# Altium PCB Main.PcbDoc
Units mm, origin at the board's own origin, x right, y up, seen from the top; angles counter-clockwise.
Board outline 72.5 x 55.5 mm, 4 copper layers (Top Layer, Ground Layer, Power Layer, Bottom Layer), stack 1.591 mm thick; 80 components, 69 nets, 301 pads, 91 vias.
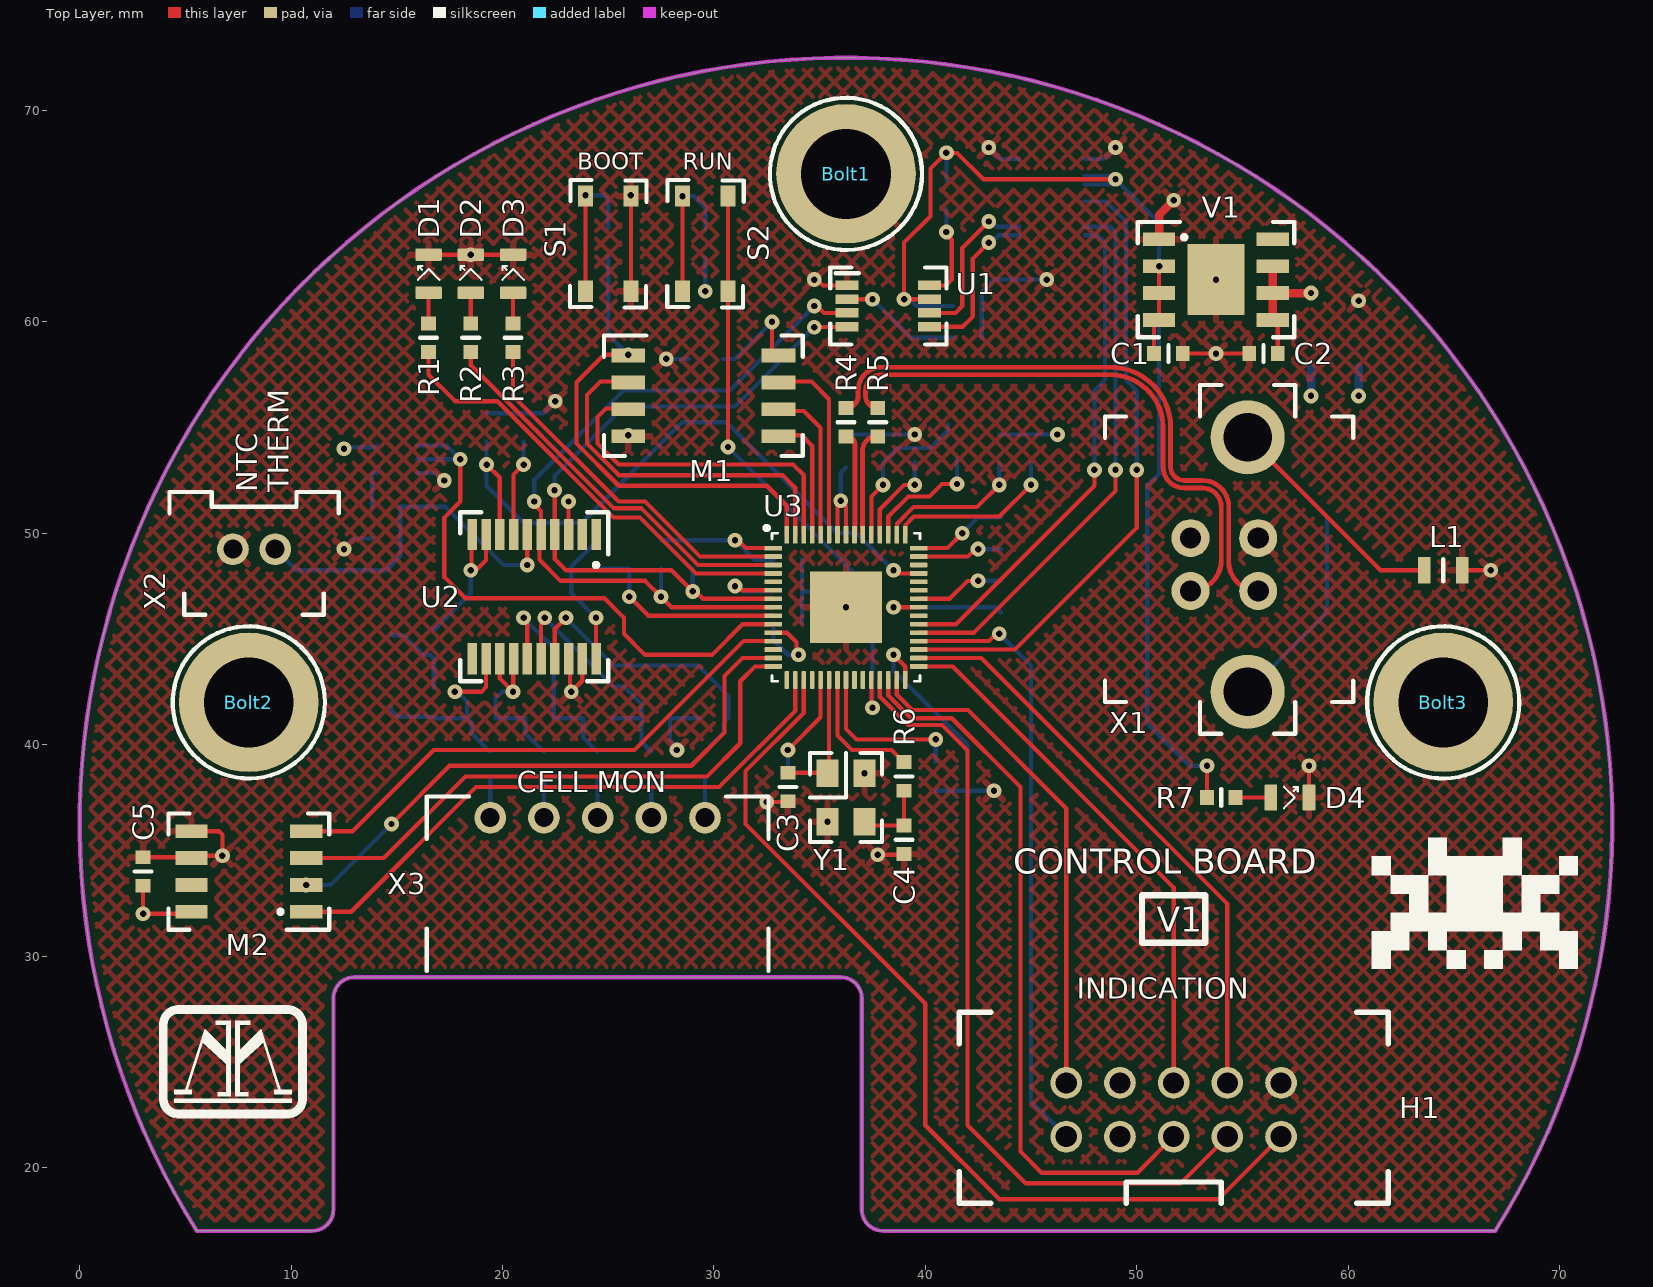
[diagram p0: Top Layer view]
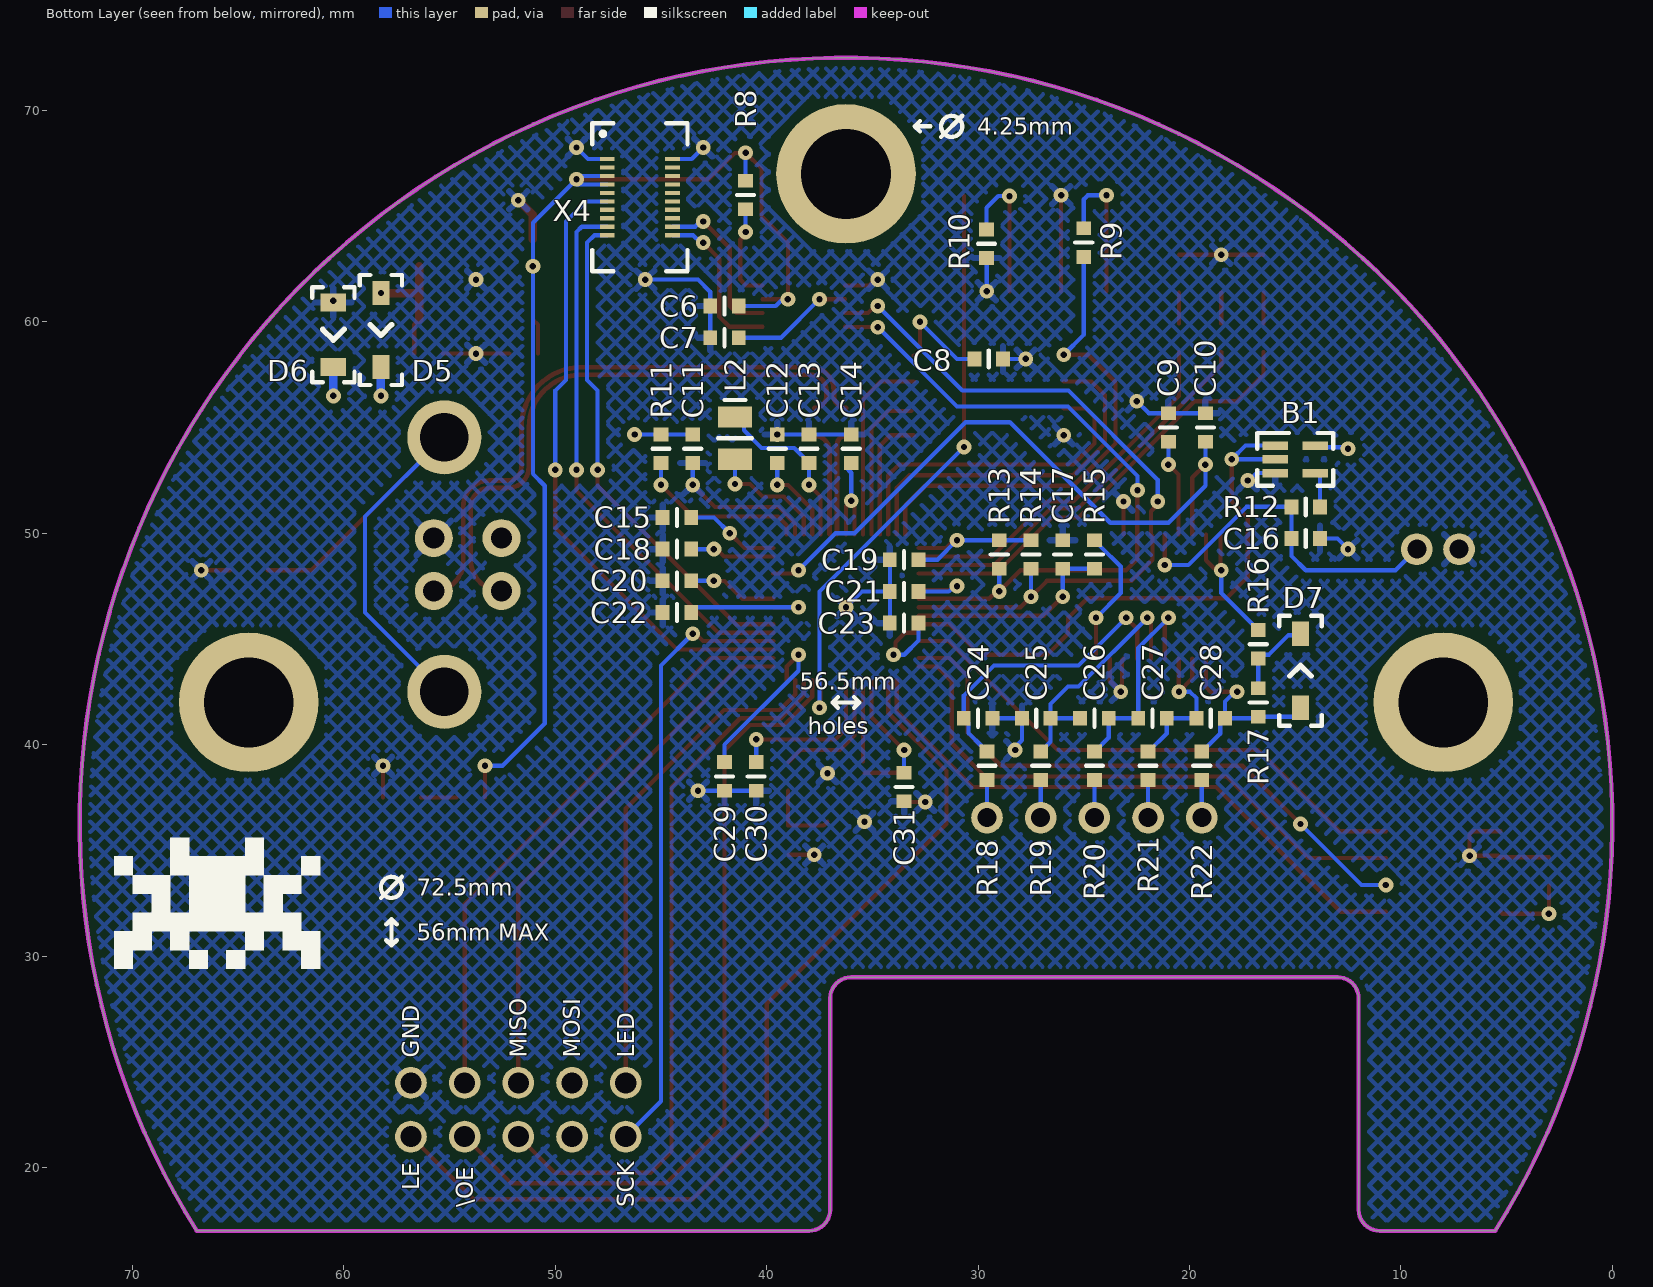
[diagram p1: Bottom Layer view, seen from below]
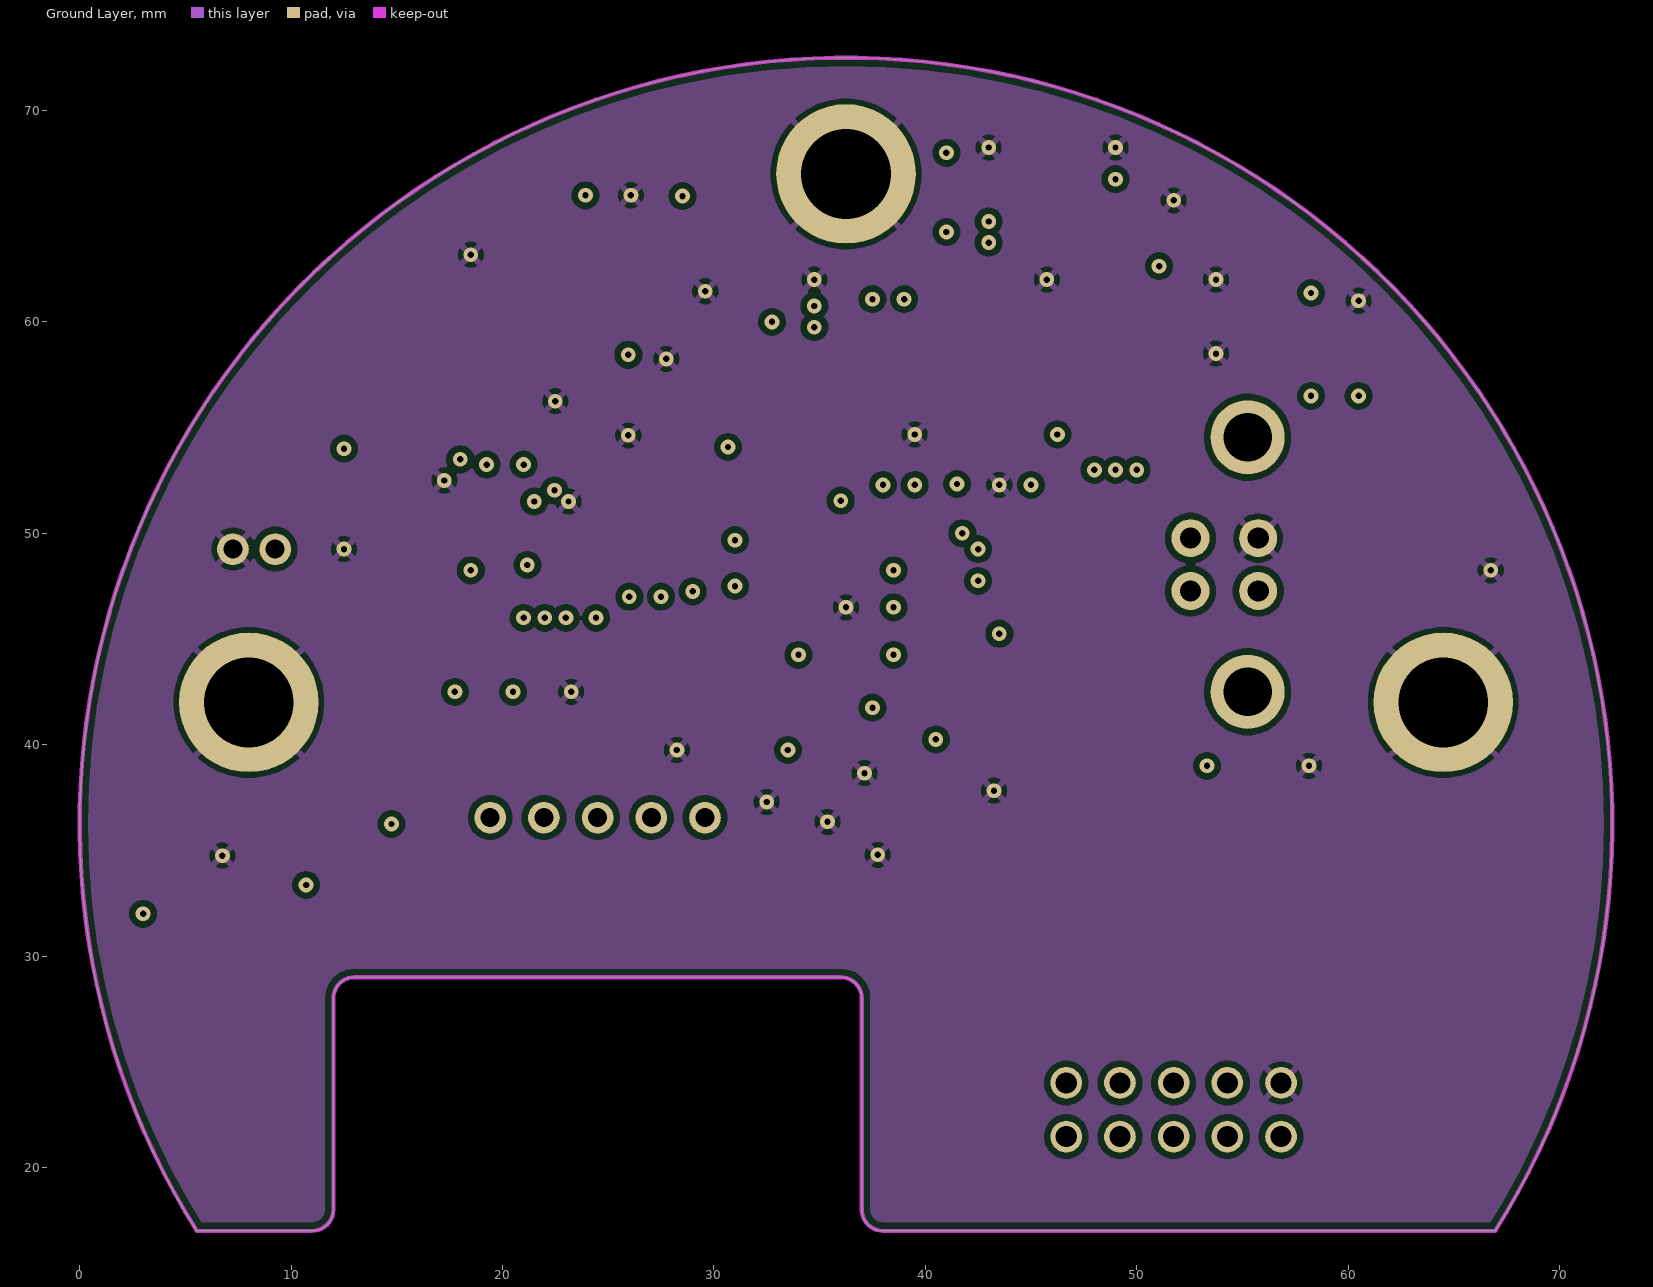
[diagram p2: Ground Layer]
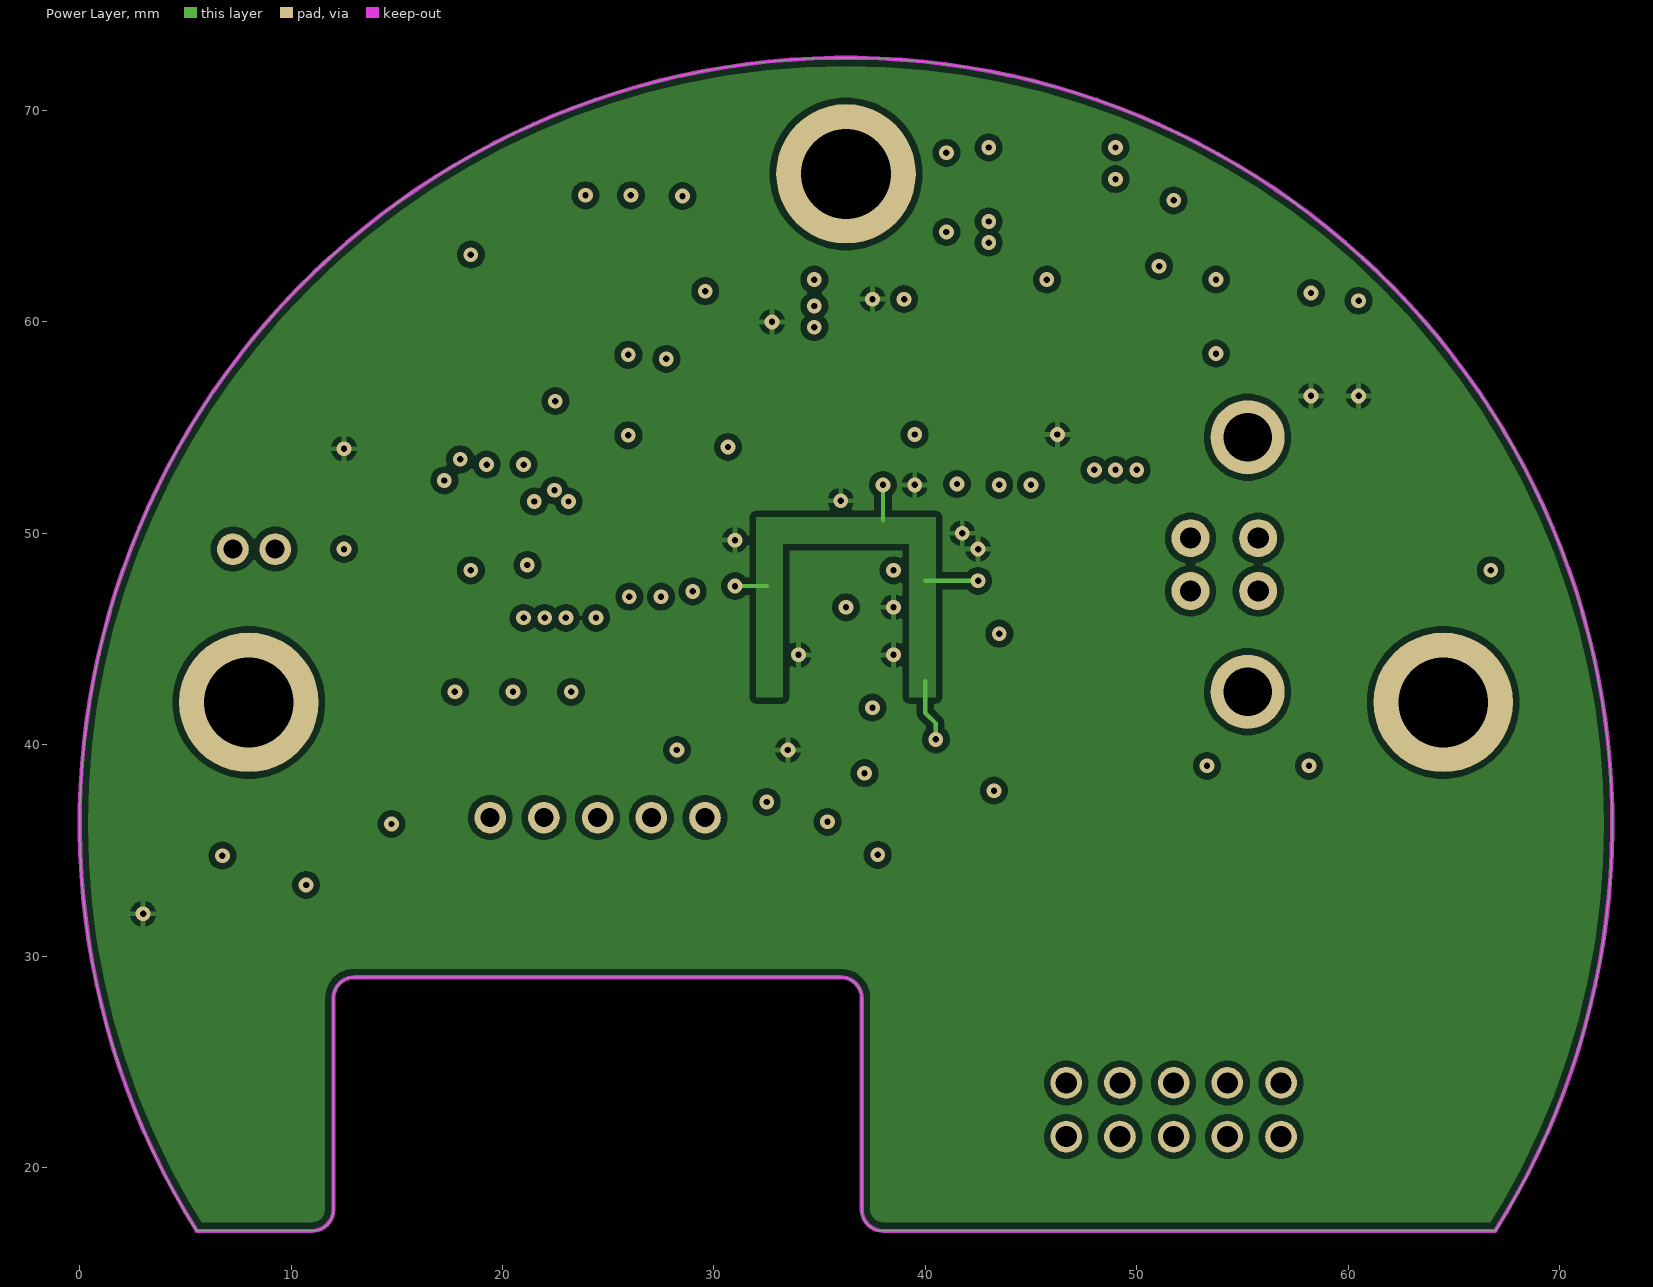
[diagram p3: Power Layer]

## Layer stack, top to bottom
Top Solder: solder mask 0.0102, Solder Resist, Dk 3.8
Top Layer: signal copper 0.035
Dielectric 2: prepreg 0.2104, 7628*1, Dk 4.4
Ground Layer: signal copper 0.0175
Dielectric 1: dielectric 1.065, FR-4, Dk 4.8
Power Layer: signal copper 0.0175
Dielectric 3: prepreg 0.2104, 7628*1, Dk 4.4
Bottom Layer: signal copper 0.035
Bottom Solder: solder mask 0.0102, Solder Resist, Dk 3.8

## Board outline
5.534,17 11,17 ccw(c11,18) 12,18 12,28 cw(c13,28) 13,29 36,29 cw(c36,28) 37,28 37,18 ccw(c38,18) 38,17 66.966,17 ccw(c36.25,36.25)

## Design rules (kind name [scope] priority, off if disabled: settings)
BoardOutlineClearance [All] p1: gap=0.2 ignorepadtopadclearanceinfootprint=FALSE
Clearance "inPolygon Clearance" [InPolygon] p1: gap=0.3 ignorepadtopadclearanceinfootprint=TRUE // this rule ensures that every net within a polygon of a different net has a set clearance from the poly
Clearance "High Current Polygon Clearance" [(InPolygon AND InNetClass('High_Current_Nets'))] p2: gap=0 ignorepadtopadclearanceinfootprint=TRUE // this rule ensures that every net within a polygon of a different net has a set clearance from the poly
Clearance "Different Diff Pair" [All] p3: gap=0.2 ignorepadtopadclearanceinfootprint=TRUE
Clearance "Same Diff Pair" [All] p4: gap=0.1 ignorepadtopadclearanceinfootprint=TRUE
Clearance "Different Nets" [not InAnyDifferentialPair] p5: gap=0.3 ignorepadtopadclearanceinfootprint=TRUE except(0.1: Arc-SMDPad Arc-THPad Arc-Via Arc-Text Track-SMDPad Track-THPad Track-Via Track-Text SMDPad-Text THPad-Text Via-Text Fill-Text Poly-Text Region-Text Text-Text; 0.12: Arc-Arc Arc-Track Track-Track; 0.15: SMDPad-SMDPad SMDPad-THPad SMDPad-Via THPad-THPad THPad-Via Via-Via; 0.2: Arc-Hole Track-Hole SMDPad-Hole THPad-Hole Via-Hole Fill-Hole Poly-Hole Region-Hole Text-Hole)
Clearance "Same Net" [not InAnyDifferentialPair] p6: gap=0 ignorepadtopadclearanceinfootprint=TRUE except(0.1: THPad-Via; 0.18: Arc-Arc Arc-Track Track-Track)
ComponentClearance [All] p1: gap=0.102 collisioncheckmode=3 verticalgap=0.102 showdistances=TRUE
DiffPairsRouting "Ethernet Routing" [InDifferentialPairClass('Ethernet_Pairs')] p1: maxlimit=0.25 minlimit=0.2 mostfreqgap=0.25 toplayer_maxgap=0.2 toplayer_prefgap=0.2 toplayer_minwidth=0.25 toplayer_maxwidth=0.25 toplayer_prefwidth=0.25 midlayer1_mingap=0.25 midlayer1_minwidth=0.19 midlayer1_maxwidth=0.19 midlayer1_prefwidth=0.19 midlayer2_mingap=0.25 midlayer2_minwidth=0.19 midlayer2_maxwidth=0.19 midlayer2_prefwidth=0.19 bottomlayer_maxgap=0.2 bottomlayer_prefgap=0.2 bottomlayer_minwidth=0.25 bottomlayer_maxwidth=0.25 bottomlayer_prefwidth=0.25 impedanceprofiledriven=TRUE maxuncoupledlength=12.7
DiffPairsRouting "USB Routing" [InDifferentialPairClass('USB_Pairs')] p2: maxlimit=0.291 minlimit=0.127 mostfreqgap=0.291 toplayer_maxgap=0.127 toplayer_prefgap=0.127 toplayer_minwidth=0.23 toplayer_maxwidth=0.23 toplayer_prefwidth=0.23 midlayer1_mingap=0.291 midlayer1_minwidth=0.25 midlayer1_maxwidth=0.25 midlayer1_prefwidth=0.25 midlayer2_mingap=0.291 midlayer2_minwidth=0.25 midlayer2_maxwidth=0.25 midlayer2_prefwidth=0.25 bottomlayer_maxgap=0.127 bottomlayer_prefgap=0.127 bottomlayer_minwidth=0.23 bottomlayer_maxwidth=0.23 bottomlayer_prefwidth=0.23 maxuncoupledlength=12.7
DiffPairsRouting "CAN Routing" [InDifferentialPairClass('CAN_Pairs')] p3: maxlimit=0.907 minlimit=0.5 mostfreqgap=0.907 toplayer_maxgap=0.5 toplayer_prefgap=0.5 toplayer_minwidth=0.201 toplayer_maxwidth=0.201 toplayer_prefwidth=0.201 midlayer1_mingap=0.907 midlayer1_minwidth=0.155 midlayer1_maxwidth=0.155 midlayer1_prefwidth=0.155 midlayer2_mingap=0.907 midlayer2_minwidth=0.155 midlayer2_maxwidth=0.155 midlayer2_prefwidth=0.155 bottomlayer_maxgap=0.5 bottomlayer_prefgap=0.5 bottomlayer_minwidth=0.201 bottomlayer_maxwidth=0.201 bottomlayer_prefwidth=0.201 maxuncoupledlength=12.7
DiffPairsRouting "RS485 Routing" [InDifferentialPairClass('RS485_Pairs')] p4: maxlimit=1.376 minlimit=0.127 mostfreqgap=1.376 toplayer_maxgap=0.127 toplayer_prefgap=0.127 toplayer_minwidth=0.1 toplayer_maxwidth=0.1 toplayer_prefwidth=0.1 midlayer1_mingap=1.376 midlayer1_minwidth=0.1 midlayer1_maxwidth=0.1 midlayer1_prefwidth=0.1 midlayer2_mingap=1.376 midlayer2_minwidth=0.1 midlayer2_maxwidth=0.1 midlayer2_prefwidth=0.1 bottomlayer_maxgap=0.127 bottomlayer_prefgap=0.127 bottomlayer_minwidth=0.1 bottomlayer_maxwidth=0.1 bottomlayer_prefwidth=0.1 impedanceprofiledriven=TRUE maxuncoupledlength=12.7
Height [All] p1: minheight=0 maxheight=1816.048 prefheight=12.7
HoleSize [All] p1: absolutevalues=TRUE maxlimit=6.3 minlimit=0.3 maxpercent=80.000 minpercent=20.000
HoleToHoleClearance [All] p1: gap=0.25 allowstackedmicrovias=FALSE
MatchedLengths "XTAL Nets Matched Delays" [InNetClass('XTAL_Nets')] p1: tolerance=25.4 checknetsindiffpair=FALSE checkdiffpairvsdiffpair=TRUE checkxsignals=TRUE checkothers=TRUE usedelayunits=TRUE delaytolerance=10.000000
MatchedLengths "Diff Pair Matched Delays" [InDifferentialPairClass('Ethernet_Pairs') or InDifferentialPairClass('USB_Pairs') or InDifferentialPairClass('CAN_Pairs')] p2: tolerance=5 checknetsindiffpair=TRUE checkdiffpairvsdiffpair=FALSE checkxsignals=FALSE checkothers=FALSE usedelayunits=TRUE delaytolerance=100.000000 phasematching=TRUE phasedelaytolerance=5.000000 phasedistance=12.7
MinimumAnnularRing [All] p1: minimumring=0.2
MinimumSolderMaskSliver [All] p1: minsoldermaskwidth=0
PlaneClearance "Supply Net Clearance" [InNetClass('Supply_Nets')] p1: clearance=0.5
PlaneClearance "All Nets" [All] p2: clearance=0.3
PolygonConnect "High Current" [InNetClass('High_Current_Nets')] p1: thpad.connectstyle=Relief thpad.reliefconductorwidth=0.4 thpad.reliefentries=4 thpad.polygonreliefangle="90 Angle" thpad.airgapwidth=0.1 thpad.conductorbypadedge=TRUE thpad.mindistance=0.381 thpad.enablemindistance=FALSE smdpad.connectstyle=Direct smdpad.reliefconductorwidth=0.254 smdpad.reliefentries=4 smdpad.polygonreliefangle="90 Angle" smdpad.airgapwidth=0.254 via.connectstyle=Direct via.reliefconductorwidth=0.254 via.reliefentries=4 via.polygonreliefangle="90 Angle" via.airgapwidth=0.254
PolygonConnect "Supply Nets" [InNetClass('Supply_Nets') OR InNetClass('Supply_Net')] p2: connectstyle=Relief reliefconductorwidth=0.3 reliefentries=4 polygonreliefangle="90 Angle" conductorbypadedge=TRUE mindistance=0.381 enablemindistance=FALSE airgapwidth=0.254
PolygonConnect General [All] p3: connectstyle=Relief reliefconductorwidth=0.254 reliefentries=4 polygonreliefangle="90 Angle" airgapwidth=0.254
RoutingVias [All] p1: holewidth=0.2 width=0.35 viastyle="Through Hole" minholewidth=0.15 minwidth=0.3 maxholewidth=6.3 maxwidth=6.55
SilkToSilkClearance [All] p1: silktosilkclearance=0
SilkToSolderMaskClearance [All] p1: minsilkscreentomaskgap=0 clearancetoexposedcopper=TRUE
SolderMaskExpansion [All] p1: expansion=0.075 istentingtop=FALSE
SupplyNets "Schematic Supply Nets_1" [InNet('+5V')] p1: voltage=0.000
SupplyNets "Schematic Supply Nets" [InNet('Earth')] p2: voltage=0.000
SupplyNets "Schematic Supply Nets_7" [InNet('+1V1')] p3: voltage=0.000
SupplyNets "Schematic Supply Nets_6" [InNet('+3V3')] p4: voltage=0.000
SupplyNets "Schematic Supply Nets_3" [InNet('GND')] p5: voltage=0.000
UnRoutedNet [All] p1: checkbadconnections=TRUE
Width "nRF Width" [InNetClass('nRF Signal')] p1: maxlimit=0.379 minlimit=0.263 preferedwidth=0.379 toplayer_minwidth=0.379 midlayer1_maxwidth=0.263 midlayer1_prefwidth=0.263 midlayer2_maxwidth=0.263 midlayer2_prefwidth=0.263 bottomlayer_minwidth=0.379 minimp=50.000000 maximp=50.000000 favimp=50.000000 checkconnectedcopper=TRUE
Width [All] p2: maxlimit=100 minlimit=0.1 preferedwidth=0.2
20 further rules are at their usual default settings.

## Classes and differential pairs
component class "Misc Peripherals": C5 C6 C7 D1 D2 D3 M2 R1 R2 R3 R8 U1
component class Power: C1 C2 D4 D5 D6 R7 V1
component class "Battery Monitoring": B1 C9 C10 C16 C17 C24 C25 C26 C27 C28 D7 R12 R15 R16 R17 R18 R19 R20 R21 R22 U2 X2
net class Supply_Nets: Earth GND
differential pair class USB_Pairs: RP2350_D RP2350_DX
component class RP2350: C3 C4 C8 C11 C12 C13 C14 C15 C18 C19 C20 C21 C22 C23 C29 C30 C31 L2 M1 R4 R5 R6 R9 R10 R11 R13 R14 S1 S2 U3 X1 Y1
component class Connectors: Bolt1 Bolt2 Bolt3 H1 L1 X3 X4
differential pair RP2350_DX: +RP2350_DX_P -RP2350_DX_N
differential pair RP2350_D: +RP2350_D_P -RP2350_D_N

## Components (designator, comment, footprint, x,y, rotation, side; value= is the part's Value field where it differs from the comment)
B1 "SN74LVC1G126DCKR" "5-TSSOP, SC-70-5, SOT-353" 15,53.5 r180 bottom
Bolt1 "M4 4mm Spacer" "[Bolt] M4 len=4mm OD=6mm Spacer" 36.25,67 r0 top
Bolt2 "M4 4mm Spacer" "[Bolt] M4 len=4mm OD=6mm Spacer" 8,42 r0 top
Bolt3 "M4 4mm Spacer" "[Bolt] M4 len=4mm OD=6mm Spacer" 64.5,42 r0 top
C1 "[Cap] 0603 10uF 20% 16V" "[Cap] SMD 0603" 51.5,58.5 r180 top (schematic designator C27)
C2 "[Cap] 0603 10uF 20% 16V" "[Cap] SMD 0603" 56,58.5 r0 top (schematic designator C28)
C3 "[Cap] 0603 15pF 1% 100V" "[Cap] SMD 0603" 33.5,38 r90 top (schematic designator C1)
C4 "[Cap] 0603 15pF 1% 100V" "[Cap] SMD 0603" 39,35.5 r90 top (schematic designator C2)
C5 "[Cap] 0603 0.1uF 10% 50V" "[Cap] SMD 0603" 3,34 r270 top (schematic designator C31)
C6 "[Cap] 0603 0.1uF 10% 50V" "[Cap] SMD 0603" 42,60.75 r180 bottom (schematic designator C29)
C7 "[Cap] 0603 0.1uF 10% 50V" "[Cap] SMD 0603" 42,59.25 r180 bottom (schematic designator C30)
C8 "[Cap] 0603 0.1uF 10% 50V" "[Cap] SMD 0603" 29.5,58.25 r0 bottom (schematic designator C17)
C9 "[Cap] 0603 1uF 10% 25V" "[Cap] SMD 0603" 21,55 r270 bottom (schematic designator C20)
C10 "[Cap] 0603 4.7uF 10% 25V" "[Cap] SMD 0603" 19.25,55 r270 bottom (schematic designator C19)
C11 "[Cap] 0603 4.7uF 10% 25V" "[Cap] SMD 0603" 43.5,54 r270 bottom
C12 "[Cap] 0603 4.7uF 10% 25V" "[Cap] SMD 0603" 39.5,54 r270 bottom (schematic designator C16)
C13 "[Cap] 0603 4.7uF 10% 25V" "[Cap] SMD 0603" 38,54 r90 bottom (schematic designator C15)
C14 "[Cap] 0603 0.1uF 10% 50V" "[Cap] SMD 0603" 36,54 r270 bottom (schematic designator C10)
C15 "[Cap] 0603 0.1uF 10% 50V" "[Cap] SMD 0603" 44.25,50.75 r180 bottom (schematic designator C9)
C16 "[Cap] 0603 4700pF 10% 50V" "[Cap] SMD 0603" 14.5,49.75 r0 bottom (schematic designator C24)
C17 "[Cap] 0603 470pF 5% 50V" "[Cap] SMD 0603" 26,49 r270 bottom (schematic designator C21)
C18 "[Cap] 0603 0.1uF 10% 50V" "[Cap] SMD 0603" 44.25,49.25 r180 bottom (schematic designator C8)
C19 "[Cap] 0603 0.1uF 10% 50V" "[Cap] SMD 0603" 33.5,48.75 r180 bottom (schematic designator C3)
C20 "[Cap] 0603 4.7uF 10% 25V" "[Cap] SMD 0603" 44.25,47.75 r180 bottom (schematic designator C14)
C21 "[Cap] 0603 0.1uF 10% 50V" "[Cap] SMD 0603" 33.5,47.25 r180 bottom (schematic designator C12)
C22 "[Cap] 0603 0.1uF 10% 50V" "[Cap] SMD 0603" 44.25,46.25 r180 bottom (schematic designator C7)
C23 "[Cap] 0603 0.1uF 10% 50V" "[Cap] SMD 0603" 33.5,45.75 r180 bottom (schematic designator C4)
C24 "[Cap] 0603 1uF 10% 25V" "[Cap] SMD 0603" 30,41.25 r180 bottom (schematic designator C26)
C25 "[Cap] 0603 1uF 10% 25V" "[Cap] SMD 0603" 27.25,41.25 r180 bottom
C26 "[Cap] 0603 1uF 10% 25V" "[Cap] SMD 0603" 24.5,41.25 r180 bottom (schematic designator C23)
C27 "[Cap] 0603 1uF 10% 25V" "[Cap] SMD 0603" 21.75,41.25 r180 bottom (schematic designator C22)
C28 "[Cap] 0603 1uF 10% 25V" "[Cap] SMD 0603" 19,41.25 r180 bottom (schematic designator C18)
C29 "[Cap] 0603 0.1uF 10% 50V" "[Cap] SMD 0603" 42,38.5 r90 bottom (schematic designator C6)
C30 "[Cap] 0603 0.1uF 10% 50V" "[Cap] SMD 0603" 40.5,38.5 r90 bottom (schematic designator C13)
C31 "[Cap] 0603 0.1uF 10% 50V" "[Cap] SMD 0603" 33.5,38 r90 bottom (schematic designator C5)
D1 "[LED] SMD 0805 Green" "[LED] SMD 0805" 16.504,62.28 r90 top (schematic designator D4)
D2 "[LED] SMD 0805 Yellow" "[LED] SMD 0805" 18.504,62.28 r90 top (schematic designator D5)
D3 "[LED] SMD 0805 Red" "[LED] SMD 0805" 20.504,62.28 r90 top (schematic designator D6)
D4 "[LED] SMD 0805 Green" "[LED] SMD 0805" 57.25,37.5 r0 top (schematic designator D7)
D5 "SOD123" "[Diode] SMD SOD-123" 58.25,59.615 r270 bottom (schematic designator D2)
D6 "SOD-123F" "[Diode] SOD-123F" 60.5,59.39 r270 bottom (schematic designator D3)
D7 "SOD123" "[Diode] SMD SOD-123" 14.75,43.5 r90 bottom (schematic designator D1)
H1 "2x5 Shrouded" "[Rectangular] Shrouded 2x5 Male" 51.75,22.83 r0 top
L1 "652-MH2029-300Y" "[Ferrite] SMD 0805" 64.5,48.25 r0 top (schematic designator L2)
L2 "[3.3uH] SMD 0806 2.1A" "[Inductor] SMD 0806" 41.5,54.5 r270 bottom (schematic designator L1)
M1 "W25Q128JVSIM" "[Flash] 128MBit" 29.5,56.5 r0 top
M2 "M93C86-WMN6TP" 8-SOIC 8,34 r180 top
R1 "[220] SMD 0603 5% 1/10W" "[Res] SMD 0603" 16.5,59.25 r270 top (schematic designator R17)
R2 "[220] SMD 0603 5% 1/10W" "[Res] SMD 0603" 18.5,59.25 r270 top (schematic designator R18)
R3 "[220] SMD 0603 5% 1/10W" "[Res] SMD 0603" 20.5,59.25 r270 top (schematic designator R19)
R4 "[27] SMD 0603 1% 1/10W" "[Res] SMD 0603" 36.25,55.25 r270 top (schematic designator R3)
R5 "[27] SMD 0603 1% 1/10W" "[Res] SMD 0603" 37.75,55.25 r270 top (schematic designator R4)
R6 "[1k] SMD 0603 1% 1/10W" "[Res] SMD 0603" 39,38.5 r90 top (schematic designator R1)
R7 "[220] SMD 0603 5% 1/10W" "[Res] SMD 0603" 54,37.5 r0 top (schematic designator R22)
R8 "[200k] SMD 0603 1% 1/10W" "[Res] SMD 0603" 41,66 r90 bottom (schematic designator R16)
R9 "[1k] SMD 0603 1% 1/10W" "[Res] SMD 0603" 25,63.75 r90 bottom (schematic designator R6)
R10 "[1k] SMD 0603 1% 1/10W" "[Res] SMD 0603" 29.6,63.7 r90 bottom (schematic designator R2)
R11 "[33] SMD 0603 0.5% 1/16W" "[Res] SMD 0603" 45,54 r270 bottom (schematic designator R5)
R12 "[3.3k] SMD 0603 1% 1/10W" "[Res] SMD 0603" 14.5,51.25 r0 bottom (schematic designator R13)
R13 "[1k] SMD 0603 1% 1/10W" "[Res] SMD 0603" 29,49 r90 bottom (schematic designator R21)
R14 "[1k] SMD 0603 1% 1/10W" "[Res] SMD 0603" 27.5,49 r90 bottom (schematic designator R20)
R15 "[499k] SMD 0603 1% 1/8W" "[Res] SMD 0603" 24.5,49 r270 bottom (schematic designator R10)
R16 "[100] SMD 0603 1% 1/10W" "[Res] SMD 0603" 16.75,44.75 r90 bottom (schematic designator R8)
R17 "[10k] SMD 0603 1% 1/10W" "[Res] SMD 0603" 16.75,42 r90 bottom (schematic designator R7)
R18 "[100] SMD 0603 1% 1/10W" "[Res] SMD 0603" 29.58,39 r90 bottom (schematic designator R15)
R19 "[100] SMD 0603 1% 1/10W" "[Res] SMD 0603" 27.04,39 r90 bottom (schematic designator R14)
R20 "[100] SMD 0603 1% 1/10W" "[Res] SMD 0603" 24.5,39 r90 bottom (schematic designator R12)
R21 "[100] SMD 0603 1% 1/10W" "[Res] SMD 0603" 21.96,39 r90 bottom (schematic designator R11)
R22 "[100] SMD 0603 1% 1/10W" "[Res] SMD 0603" 19.42,39 r90 bottom (schematic designator R9)
S1 "[SPST] SMD Pushbutton" "[SPST] SMD Pushbutton" 25,63.7 r90 top (schematic designator S2)
S2 "[SPST] SMD Pushbutton" "[SPST] SMD Pushbutton" 29.591,63.7 r90 top (schematic designator S1)
U1 "[Level Shifter] I2C Level Shifter" "[Level Shifter] I2C Level Shifter" 38.25,60.75 r0 top (schematic designator U3)
U2 "[Batt Mon] 3-5 Cell BMS" "[Batt Mon] 3-5 Cell BMS" 21.5,47 r270 top
U3 "RP2350A" "[MCU] RP2350A" 36.25,46.5 r0 top (schematic designator U1)
V1 "3V3 1.5A" "[Linear] 3V3 1.5A" 53.75,62 r0 top
X1 "USB-B-S-VT" "[USB] Type-B Vertical" 54.15,48.52 r90 top
X2 "[Sherlock] 2pin" "[Sherlock] 2pin" 7.25,49.25 r0 top (schematic designator X4)
X3 "[JST] 5pin 90deg 2.54mm pitch" "[JST] 5pin 90deg 2.54mm pitch" 24.5,36.55 r270 top
X4 "[Mezzanine] 20pin H=4.0mm" "[Mezzanine] 20pin H=4.0mm Male" 46,65.9 r270 bottom (schematic designator X2)
Y1 "XTAL 12MHz" "[Crystal] SMD 12MHz" 36.25,37.5 r270 top

## Footprints (in the part's own frame and the unit in brackets; to place one, negate y for a bottom-side part, rotate by r counter-clockwise, add the part's x,y. Pads: shape width x height; smd on the part's side, far side on the other; paste and mask are expansions set on the pad)
"5-TSSOP, SC-70-5, SOT-353" [mm]
  rect 1.2x0.4 smd: 1(-0.95,0.65) 2(-0.95,0) 3(-0.95,-0.65) 4(0.95,-0.65) 5(0.95,0.65)
  silkscreen extent -1.8,-1.25 1.8,1.25, body extent -1.05,-1 1.05,1, height 1
8-SOIC [mm]
  rect 1.528x0.65 smd: 1(-2.711,1.905) 2(-2.711,0.635) 3(-2.711,-0.635) 4(-2.711,-1.905) 5(2.711,-1.905) 6(2.711,-0.635) 7(2.711,0.635) 8(2.711,1.905)
  silkscreen extent -3.8,-2.75 3.8,2.75, body extent -3.01,-2.45 3.01,2.45, height 1.63
"[Batt Mon] 3-5 Cell BMS" [mm]
  rect 1.475x0.45 smd: 1(-2.938,2.925) 2(-2.938,2.275) 3(-2.938,1.625) 4(-2.938,0.975) 5(-2.938,0.325) 6(-2.938,-0.325) 7(-2.938,-0.975) 8(-2.938,-1.625) 9(-2.938,-2.275) 10(-2.938,-2.925) 11(2.938,-2.925) 12(2.938,-2.275) 13(2.938,-1.625) 14(2.938,-0.975) 15(2.938,-0.325) 16(2.938,0.325) 17(2.938,0.975) 18(2.938,1.625) 19(2.938,2.275) 20(2.938,2.925)
  silkscreen extent -4,-3.5 4,3.5, body extent -3.2,-3.25 3.2,3.25, height 1.13
"[Bolt] M4 len=4mm OD=6mm Spacer" [mm]
  round 6.6 hole 4.25: 1(0,0)
  silkscreen extent -3.6,-3.6 3.6,3.6, body extent -3,-3 3,3, height 4
"[Cap] SMD 0603" [mm]
  rect 0.65x0.7 smd: 1(-0.675,0) 2(0.675,0)
  silkscreen extent 0,-0.4 0,0.4, body extent -0.8,-0.45 0.8,0.45, height 0.8
"[Crystal] SMD 12MHz" [mm]
  rect 1.3x1.05 smd: 1(-1.15,-0.875) 2(1.15,-0.875) 3(1.15,0.875) 4(-1.15,0.875)
  silkscreen extent -2.1,-1.7 2.1,1.7, body extent -1.6,-1.25 1.6,1.25, height 0.75
"[Diode] SMD SOD-123" [mm]
  rect 1.15x0.8 smd: 1(1.75,0) 2(-1.75,0)
  silkscreen extent -2.6,-1 2.6,1, body extent -1.85,-0.8 1.86,0.8, height 1.35
"[Diode] SOD-123F" [mm]
  rect 0.85x1.2 smd: 1(1.525,0) 2(-1.525,0)
  silkscreen extent -2.25,-1 2.25,1, body extent -1.75,-0.8 1.75,0.8, height 0.8
"[Ferrite] SMD 0805" [mm]
  rect 0.6x1.25 smd: 1(-0.9,0) 2(0.9,0)
  silkscreen extent 0,-0.53 0,0.53, body extent -1,-0.6 1,0.6, height 1.1
"[Flash] 128MBit" [mm] "W25Q128JVSIM"
  rect 1.6x0.65 smd: 1(-3.55,1.905) 2(-3.55,0.635) 3(-3.55,-0.635) 4(-3.55,-1.905) 5(3.55,-1.905) 6(3.55,-0.635) 7(3.55,0.635) 8(3.55,1.905)
  silkscreen extent -4.7,-2.85 4.7,2.85, body extent -3.9,-2.61 3.9,2.62, height 1.95
"[Inductor] SMD 0806" [mm]
  rect 1x1.6 smd: 1(-1,0) 2(1,0)
  silkscreen extent -1.8,-0.8 0,0.8, body extent -1,-0.8 1,0.8, height 1
"[JST] 5pin 90deg 2.54mm pitch" [mm]
  round 1.5 hole 0.9: 1(0,-5.08) 2(0,-2.54) 3(0,0) 4(0,2.54) 5(0,5.08)
  silkscreen extent -1,-8.08 7.25,8.08, body extent -0.46,-7.71 7,7.71, height 5.88
"[LED] SMD 0805" [mm]
  rrect20% 0.6x1.25 smd: 1(-0.9,0) 2(0.9,0)
  silkscreen extent -0.28,-0.51 0.37,0.51, body extent -1,-0.65 1,0.65, height 0.8
"[Level Shifter] I2C Level Shifter" [mm] "PCA9306DCTR"
  rect 1.1x0.45 smd: 1(-1.95,0.975) 2(-1.95,0.325) 3(-1.95,-0.325) 4(-1.95,-0.975) 5(1.95,-0.975) 6(1.95,-0.325) 7(1.95,0.325) 8(1.95,0.975)
  silkscreen extent -2.75,-1.83 2.75,1.83, body extent -2,-1.48 2,1.48, height 1.3
"[Linear] 3V3 1.5A" [mm]
  rect 1.525x0.65 smd: 1(-2.688,1.905) 2(-2.688,0.635) 3(-2.688,-0.635) 4(-2.688,-1.905) 5(2.688,-1.905) 6(2.688,-0.635) 7(2.688,0.635) 8(2.688,1.905)
  rect 2.71x3.35 smd: 9(0,0)
  silkscreen extent -3.7,-2.73 3.7,2.73, body extent -3,-2.45 3,2.45, height 1.5
"[MCU] RP2350A" [mm]
  rrect25% 0.83x0.22 smd: 1(-3.44,2.8) 2(-3.44,2.4) 3(-3.44,2) 4(-3.44,1.6) 5(-3.44,1.2) 6(-3.44,0.8) 7(-3.44,0.4) 8(-3.44,0) 9(-3.44,-0.4) 10(-3.44,-0.8) 11(-3.44,-1.2) 12(-3.44,-1.6) 13(-3.44,-2) 14(-3.44,-2.4) 15(-3.44,-2.8) 31(3.44,-2.8) 32(3.44,-2.4) 33(3.44,-2) 34(3.44,-1.6) 35(3.44,-1.2) 36(3.44,-0.8) 37(3.44,-0.4) 38(3.44,0) 39(3.44,0.4) 40(3.44,0.8) 41(3.44,1.2) 42(3.44,1.6) 43(3.44,2) 44(3.44,2.4) 45(3.44,2.8)
  rrect25% 0.22x0.83 smd: 16(-2.8,-3.44) 17(-2.4,-3.44) 18(-2,-3.44) 19(-1.6,-3.44) 20(-1.2,-3.44) 21(-0.8,-3.44) 22(-0.4,-3.44) 23(0,-3.44) 24(0.4,-3.44) 25(0.8,-3.44) 26(1.2,-3.44) 27(1.6,-3.44) 28(2,-3.44) 29(2.4,-3.44) 30(2.8,-3.44) 46(2.8,3.44) 47(2.4,3.44) 48(2,3.44) 49(1.6,3.44) 50(1.2,3.44) 51(0.8,3.44) 52(0.4,3.44) 53(0,3.44) 54(-0.4,3.44) 55(-0.8,3.44) 56(-1.2,3.44) 57(-1.6,3.44) 58(-2,3.44) 59(-2.4,3.44) 60(-2.8,3.44)
  rect 3.4x3.4 smd paste-4: 61(0,0)
  silkscreen extent -3.85,-3.5 3.5,3.85, body extent -3.55,-3.55 3.55,3.55, height 0.96
"[Mezzanine] 20pin H=4.0mm Male" [mm] "DF40TC(4.0)-20DS-0.4V(58)"
  rect 0.2x0.7 smd paste-0.016 mask+0.05: 1(-1.8,-1.54) 2(-1.8,1.54) 3(-1.4,-1.54) 4(-1.4,1.54) 5(-1,-1.54) 6(-1,1.54) 7(-0.6,-1.54) 8(-0.6,1.54) 9(-0.2,-1.54) 10(-0.2,1.54) 11(0.2,-1.54) 12(0.2,1.54) 13(0.6,-1.54) 14(0.6,1.54) 15(1,-1.54) 16(1,1.54) 17(1.4,-1.54) 18(1.4,1.54) 19(1.8,-1.54) 20(1.8,1.54)
  silkscreen extent -3.5,-2.25 3.5,2.25, body extent -3.3,-1.7 3.3,1.68, height 3.9
"[Rectangular] Shrouded 2x5 Male" [mm]
  round 1.5 hole 1: 1(-5.08,-1.37) 2(-5.08,1.17) 3(-2.54,-1.37) 4(-2.54,1.17) 5(0,-1.37) 6(0,1.17) 7(2.54,-1.37) 8(2.54,1.17) 9(5.08,-1.37) 10(5.08,1.17)
  silkscreen extent -10.15,-4.52 10.15,4.52, body extent -10.15,-4.52 10.15,4.52, height 8.8
"[Res] SMD 0603" [mm]
  rect 0.65x0.7 smd: 1(-0.675,0) 2(0.675,0)
  silkscreen extent 0,-0.4 0,0.4, body extent -0.8,-0.45 0.8,0.45, height 0.8
"[Sherlock] 2pin" [mm]
  round 1.5 hole 0.9: 1(0,0) 2(2,0)
  silkscreen extent -3,-3.1 5,2.7, body extent -2.86,-2.94 4.84,2.61, height 8.5
"[SPST] SMD Pushbutton" [mm] "PTS815SJM250SMTRLFS"
  rect 1x0.7 smd: 1(-2.25,1.075) 1(2.25,1.075) 2(-2.25,-1.075) 2(2.25,-1.075)
  silkscreen extent -3.02,-1.82 3.02,1.8, body extent -2.25,-1.6 2.25,1.6, height 2.5
"[USB] Type-B Vertical" [mm] "USB-B-S-VT"
  round 1.8 hole 1: 1(1.25,1.6) 2(-1.25,1.6) 3(-1.25,-1.6) 4(1.25,-1.6)
  round 3.5 hole 2.3: MH(-6.02,-1.1) MH(6.02,-1.1)
  silkscreen extent -8,-6.1 8.5,5.65, body extent -7.35,-5.8 7.35,5.4, height 16.1

## Part data
B1: library part "[Buffer] Single Tri-State Active-High OE", Supplier Part Number 1=296-11606-6-ND, Supplier 1=DigiKey
Bolt1 Bolt2 Bolt3: library part "[Bolt] M4 len=4mm OD=6mm Spacer", "ID: 4mm / OD: 6mm", ComponentLink1Description="McMaster Supplier", ComponentLink1URL=https://www.mcmaster.com/94669A006/
C1 C2: "GRM188C81C106MA73D", Capacitance=10uF, Max Voltage=16V, Size Package=0603, Supplier Part Number 1=490-7198-1-ND, Tolerance=20%, Supplier 1=DigiKey
C3 C4: "GCM1885C2A150FA16D", Capacitance=15pF, Max Voltage=100V, Size Package=0603, Supplier Part Number 1=490-16416-1-ND, Tolerance=1%, Supplier 1=DigiKey
C5 C6 C7 C8 C14 C15 C18 C19 C21 C22 C23 C29 C30 C31: "CL10B104KB8NNNC", Capacitance=100nF, Max Voltage=50V, Size Package=0603, Supplier Part Number 1=1276-1000-6-ND, Tolerance=10%, Supplier 1=DigiKey
C9 C24 C25 C26 C27 C28: "CL10B105KA8NNNC", Capacitance=1uF, Max Voltage=25V, Size Package=0603, Supplier Part Number 1=1276-1184-1-ND, Tolerance=10%, Supplier 1=DigiKey
C10 C11 C12 C13 C20: "GRM188R61E475KE11D", Capacitance=4.7uF, Max Voltage=25V, Size Package=0603, Supplier Part Number 1=490-7203-6-ND, Tolerance=10%, Supplier 1=DigiKey
C16: "CL10B472KB8WPNC", Capacitance=4700pF, Max Voltage=50V, Size Package=0603, Supplier Part Number 1=1276-6532-1-ND, Tolerance=10%, Supplier 1=DigiKey
C17: "C0603C471J5GACTU", Capacitance=470pF, Max Voltage=50V, Size Package=0603, Supplier Part Number 1=399-C0603C471J5GACTUDKR-ND, Tolerance=5%, Supplier 1=DigiKey
D1 D4: "LG R971-KN-1-0-20-R18", Color=Green, Size Package=0805, Supplier Part Number 1=475-LGR971-KN-1CT-ND, Supplier 1=DigiKey
D2: "LY R976-PS-36-0-20-R18", Color=Yellow, Size Package=0805, Supplier Part Number 1=475-LYR976-PS-36-0-20-R18CT-ND, Supplier 1=DigiKey
D3: "LS R976-NR-1-0-20-R18", Color=Red, Size Package=0805, Supplier Part Number 1=475-LSR976-NR-1CT-ND, Supplier 1=DigiKey
D5 D7: library part "[Schottky] SMD 40V 1A", "B5819W-TP", Supplier Part Number 1=B5819W-TPMSCT-ND, Supplier 1=DigiKey
D6: library part "[Zener] SMD 3.5V 1W 6%", "KDZVTR3.3B", Optimal Zener Voltage=3.5V, Supplier Part Number 1=846-KDZVTR3.3BCT-ND, Tolerance=6.06%, Supplier 1=DigiKey, Wattage=1W
H1: library part "[Rectangular] Shrouded 2x5 Male", "BHR-10-VUA", Supplier Part Number 1=2057-BHR-10-VUA-ND, Supplier 1=DigiKey, System=Connector
L1: library part "[Ferrite] SMD 0805 3A 30ohm", Res @ Freq="30 @ 100MHz", Size Package=0805, Supplier Part Number 1=MH2029-300YCT-ND, Supplier 1=DigiKey
L2: "AOTA-B201610S3R3-101-T", Inductance=3.3uH, Package=0806, Supplier Part Number 1=535-AOTA-B201610S3R3-101-TCT-ND, Supplier 1=DigiKey
M1: library part "[Flash] 128MBit", Supplier Part Number 1=W25Q128JVSIM-ND, Supplier 1=DigiKey
M2: library part "[Flash] 16kb", Supplier Part Number 1=497-8665-1-ND, Supplier 1=DigiKey
R1 R2 R3 R7: "RK73B1JTTD221J", Resistance=220, Size Package=0603, Supplier Part Number 1=2019-RK73B1JTTD221JDKR-ND, Tolerance=5%, Supplier 1=DigiKey, Wattage=1/8W
R4 R5: "MCT06030C2709FP500", Resistance=27, Size Package=0603, Supplier Part Number 1=749-1631-1-ND, Tolerance=1%, Supplier 1=DigiKey, Wattage=1/10W
R6 R9 R10 R13 R14: "RMCF0603FT1K00", Resistance=1k, Size Package=0603, Supplier Part Number 1=RMCF0603FT1K00DKR-ND, Tolerance=1%, Supplier 1=DigiKey, Wattage=1/10W
R8: "RC0603JR-07200KL", Resistance=200k, Size Package=0603, Supplier Part Number 1=311-200KGRCT-ND, Tolerance=5%, Supplier 1=DigiKey, Wattage=1/10W
R11: "RR0816Q-330-D", Resistance=33, Size Package=0603, Supplier Part Number 1=RR08Q33DDKR-ND, Tolerance=0.5%, Supplier 1=DigiKey, Wattage=1/16W
R12: "RC0603FR-073K3L", Resistance=3.3k, Size Package=0603, Supplier Part Number 1=311-3.30KHRCT-ND, Tolerance=1%, Supplier 1=DigiKey, Wattage=1/10W
R15: "CRCW0603499KFKEA", Resistance=499k, Size Package=0603, Supplier Part Number 1=541-499KHCT-ND, Tolerance=1%, Supplier 1=DigiKey, Wattage=1/8W
R16 R18 R19 R20 R21 R22: "RC0603FR-07100RL", Resistance=100, Size Package=0603, Supplier Part Number 1=311-100HRDKR-ND, Tolerance=1%, Supplier 1=DigiKey, Wattage=1/10W
R17: "RMCF0603FT10K0", Resistance=10k, Size Package=0603, Supplier Part Number 1=RMCF0603FT10K0DKR-ND, Tolerance=1%, Supplier 1=DigiKey, Wattage=1/10W
S1 S2: "PTS815SJM250SMTRLFS", Supplier Part Number 1=CKN12215-6-ND, Supplier 1=DigiKey
U1: "PCA9306DCTR", Supplier Part Number 1=296-18509-1-ND, Supplier 1=DigiKey
U2: "BQ7692006PWR", Supplier Part Number 1=296-39960-1-ND, Supplier 1=DigiKey
U3: library part "[MCU] RP2350A", "QFN-60 Package", Supplier Part Number 1=2648-SC1509-A4CT-ND, Supplier 1=DigiKey
V1: library part "[Linear] SMD 3V3 1.5A", "AP7362A-33SP-13", Supplier Part Number 1=AP7362A-33SP-13DICT-ND, Supplier 1=DigiKey
X1: library part "[USB] Type-B Vertical", Supplier Part Number 1=2057-USB-B-S-VT-ND, Supplier 1=DigiKey
X2: "0353620250", Supplier Part Number 1=WM18920-ND, Supplier 1=DigiKey
X4: "DF40TC(4.0)-20DS-0.4V(58)", Supplier Part Number 1=26-DF40TC(4.0)-20DS-0.4V(58)CT-ND, Supplier 1=DigiKey, System=Connector
Y1: library part "[Crystal] SMD 12MHz", "815-ABM8-272-T3", Supplier Part Number 1=535-ABM8-272-T3CT-ND, Supplier 1=DigiKey

## Via types
v1: diameter 0.7, hole 0.3, Top Layer to Bottom Layer, 91 vias

## Nets (pads, with @x,y where several pads share a name; then routed paths per layer and width w, separated by ;. In a path a pad name is that pad's centre, name@x,y a point inside that pad or via, vN(x,y) a via of type N, cw(c..) or ccw(c..) an arc to the next point about the centre after c; other vN are vias at no path point)
+1V1: C13.1 C20.2 C21.2 C30.2 L2.1 U3.6 U3.23 U3.39 U3.50 | length 32.1
  Top Layer w0.2: v1(31,47.5) 31.135,47.5 31.335,47.3 U3.6 ; U3.23 36.25,40.75 36.75,40.25 v1(40.5,40.25) ; U3.50 37.45,51.74 v1(38,52.29) ; U3.39 41.15,46.9 41.995,47.745 42.495,47.745 v1(42.5,47.75)
  Power Layer w0.2: v1(31,47.5) 32.5,47.5 ; 38,50.615 v1(38,52.29) ; 40,43 40,41.5 40.5,41 v1(40.5,40.25) ; 40,47.75 v1(42.5,47.75)
  Bottom Layer w0.2: v1(31,47.5) 31.135,47.5 31.385,47.25 C21.2 ; v1(38,52.29) 38,53.34 38.7,54.04 40.25,54.04 41.081,54.871 L2.1@41.081,55.14 ; C30.2 v1(40.5,40.25) ; v1(42.5,47.75) C20.2
+3V3: B1.5 C5.2 C7.2 C8.2 C11.1 C12.2 C14.2 C15.2 C18.2 C19.2 C22.2 C23.2 C29.2 C31.2 D5.1 D6.1 M1.8 M2.8 R11.1 R13.2 R14.2 U1.2 U3.1 U3.11 U3.20 U3.30 U3.38 U3.44 U3.45 U3.49 U3.53 U3.54 | length 70.5
  Top Layer w0.2: C5.2 v1(3,32) 5.194,32 M2.8 ; v1(31,49.675) 31.135,49.675 31.51,49.3 U3.1 ; v1(32.75,60) 32.75,58.63 32.975,58.405 M1.8 ; U3.11 33.45,45.3 33.904,44.846 33.904,44.346 v1(34,44.25) ; v1(33.5,39.75) 35.05,41.3 U3.20 ; U3.54 35.85,51.39 v1(36,51.54) 36.25,51.29 U3.53 ; U1.2 v1(37.5,61.075) ; U3.49 37.85,51.14 38.994,52.284 v1@39.494,52.284 ; v1(38.5,44.25) 39.05,43.7 U3.30 ; v1(38.5,46.5) U3.38 ; U3.44 42.015,48.9 42.365,49.25 v1(42.5,49.25) ; U3.45 41.05,49.3 v1(41.75,50)
  Bottom Layer w0.2: v1(12.5,54) 12.575,54.075 13.975,54.075 B1.5 ; R14.2 R13.2 v1(31,49.675) 31.925,48.75 C19.2 ; C8.2@30.425,58.25 31,58.25 v1(32.75,60) ; C23.2 32.825,44.922 33.493,44.254 33.996,44.254 v1(34,44.25) ; C31.2 v1(33.5,39.75) ; v1(36,51.54) 36,52.865 C14.2@36.25,53.115 ; v1(37.5,61.075) 39.325,59.25 C7.2 ; v1(38.5,44.25) 38.5,43.5 42,40 C29.2 ; v1(38.5,46.5) 43.35,46.5 43.575,46.275 C22.2 ; v1(39.5,52.29) C12.2@39.5,53.365 ; v1(41.75,50) 42.5,50.75 C15.2 ; v1(42.5,49.25) C18.2 ; C11.1 R11.1 v1(46.25,54.675)
  Bottom Layer w0.4: v1(58.25,56.5) D5.1 ; v1(60.5,56.5) D6.1
+5V: C1.2 C6.2 R7.1 R8.2 U1.7 V1.2 V1.3 V1.4 X4.5 X4.7 | length 60.3
  Top Layer w0.2: U1.7 v1(39,61.075) 39,63.75 40.25,65 40.25,67.25 v1(41,68) 41.005,67.995 41.505,67.995 42.75,66.75 v1(49,66.75) ; C1.2 50.825,59.87 51.05,60.095 V1.4 V1.3 v1(51.062,62.635) ; R7.1 v1(53.325,39)
  Bottom Layer w0.2: v1@39,61.325 39.575,60.75 C6.2 ; R8.2 v1(41,68) ; X4.7 v1@49,66.5 ; X4.5 48.73,66.9 v1@48.75,66.88 ; v1(49,66.75) 51.062,64.688 v1(51.062,62.635) 51.062,52.812 50.5,52.25 50.5,41 52.5,39 v1(53.325,39)
\16kB_Mem_CS: M2.1 U3.17 | length 28.5
  Top Layer w0.2: M2.1 12.845,32.095 18.75,38 30.25,38 33.85,41.6 U3.17
\Seg_OE: H1.7 U3.27 | length 38.1
  Top Layer w0.2: U3.27 37.85,42.267 39.187,40.93 40.795,40.93 42,39.725 42,22 44.75,19.25 52.08,19.25 H1.7
ALERT_PIN: R15.1 U2.20 | length 6.6
  Top Layer w0.2: U2.20 v1(24.425,46)
  Bottom Layer w0.2: v1(24.425,46) 23.25,47.175 23.25,48.425 24.25,49.425 24.25,49.45 24.475,49.675 R15.1
BAT: R16.2 U2.9 U2.10 | length 7.4
  Top Layer w0.2: U2.10 18.538,49.901 18.538,48.288 v1(18.5,48.25) 18.596,48.346 18.846,48.346 19.225,48.725 U2.9
  Bottom Layer w0.2: R16.2 16.775,45.425 17,45.65 17,45.675 18.5,47.175 v1(18.5,48.25)
Batt_Mon_Alert: C17.2 R15.2 U3.9 | length 10
  Top Layer w0.2: v1(26,47) 26.9,46.1 U3.9
  Bottom Layer w0.2: R15.2 C17.2 v1(26,47)
Batt_Mon_Reset: B1.1 B1.2 U3.10 | length 28.4
  Top Layer w0.2: v1(18,53.5) 18,51.5 17.25,50.75 17.25,47.925 18.25,46.925 24.825,46.925 25.75,46 25.75,45.25 26.75,44.25 29.905,44.25 31.355,45.7 U3.10
  Bottom Layer w0.2: B1.2 v1(18,53.5) 17.35,54.15 B1.1
Buzzer_Ctrl_1: U3.36 X4.19 | length 23.8
  Top Layer w0.2: U3.36 41.45,45.7 48,52.25 v1(48,53)
  Bottom Layer w0.2: X4.19 48.15,64.1 48.5,63.75 48.5,57.25 48,56.75 v1(48,53)
Buzzer_Ctrl_2: U3.35 X4.17 | length 25.9
  Top Layer w0.2: U3.35 42.3,45.3 49,52 v1(49,53)
  Bottom Layer w0.2: X4.17 48.75,64.5 49,64.25 v1(49,53)
Cell0: R18.1 X3.5 | length 1.8
  Bottom Layer w0.2: X3.5@29.58,36.5 R18.1
Cell1: R19.1 X3.4 | length 1.8
  Bottom Layer w0.2: X3.4@27.04,36.5 R19.1
Cell2: R20.1 X3.3 | length 1.8
  Bottom Layer w0.2: X3.3@24.5,36.5 R20.1
Cell3: R21.1 X3.2 | length 1.8
  Bottom Layer w0.2: X3.2@21.96,36.5 R21.1
Cell4: R22.1 X3.1 | length 1.8
  Bottom Layer w0.2: X3.1@19.42,36.5 R22.1
Earth: L1.1 X1.MH | length 26.1
  Top Layer w0.2: X1.MH@55.25,54.54 61.54,48.25 L1.1
  Bottom Layer w0.2: X1.MH@55.25,42.5 59,46.25 59,50.79 X1.MH@55.25,54.54
External_LED_1: H1.9 U3.18 | length 45.2
  Top Layer w0.2: U3.18 34.25,41.5 31.5,38.75 31.5,36.25 40,27.75 40,22 43.5,18.5 53.87,18.5 H1.9
External_LED_2: H1.2 U3.29 | length 23.9
  Top Layer w0.2: U3.29 38.65,42.373 39.383,41.64 42.015,41.64 46.67,36.985 H1.2
GND: B1.3 Bolt1.1 Bolt2.1 Bolt3.1 C1.1 C2.1 C3.1 C4.1 C5.1 C6.1 C7.1 C8.1 C9.1 C10.1 C11.2 C12.1 C13.2 C14.1 C15.1 C16.1 C17.1 C18.1 C19.1 C20.1 C21.1 C22.1 C23.1 C24.2 C25.1 C29.1 C30.1 C31.1 D1.2 D2.2 D3.2 D4.2 D6.2 H1.10 L1.2 M1.4 M2.5 M2.6 R10.1 S1.2 U1.1 U2.3 U2.18 U2.19 U3.47 U3.61 V1.1 V1.9 X1.4 X2.1 X4.1 X4.2 Y1.2 Y1.4 | length 71.6
  Top Layer w0.2: C5.1 5.249,34.675 M2.6 5.404,34.75 v1(6.75,34.75) 6.75,35.75 6.595,35.905 M2.5 ; D1.2 v1(18.503,63.18) D3.2 ; U2.18 23.187,44 23.187,42.562 v1(23.25,42.5) 23.775,43.025 U2.19 ; U2.3 v1(23.125,51.5) ; S1.2@26.075,61.45 v1(26.075,65.99) ; v1(32.5,37.29) C3.1@33.465,37.29 ; v1(34.75,62) 34.885,62 35.16,61.725 U1.1 ; v1(37.75,34.79) C4.1@38.965,34.79 ; U3.47@38.66,49.95 38.66,50.45 39.45,51.24 42.45,51.24 v1(43.5,52.29) ; C1.1 v1(53.75,58.5) C2.1 ; D4.2 v1(58.15,39) ; L1.2 v1(66.75,48.25)
  Top Layer w0.4: V1.1 51.062,65.062 v1(51.75,65.75)
  Bottom Layer w0.2: v1(12.5,49.25) 13,49.75 C16.1 ; B1.3 16.83,52.85 17.18,52.5 v1(17.25,52.5) ; C10.1 C9.1 21.925,55.675 v1(22.5,56.25) ; v1(27.75,58.25) C8.1 ; v1(28.25,39.75) 28.25,39.885 27.925,40.21 C25.1 C24.2 ; v1(29.591,61.45) 29.591,63.016 R10.1 ; C23.1 C21.1 ; C19.1 C21.1 ; C14.1 C13.2 v1(39.5,54.675) ; v1(36.25,46.5) 35.5,47.25 C21.1 ; C30.1 C29.1 C29.1@42.075,37.75 ; C29.1@42.075,37.825 v1(43.25,37.825) ; C7.1 C6.1 42.675,61.425 43.25,62 v1(45.75,62) ; v1(43,68.25) 43.55,67.7 X4.2 ; v1(43.5,52.29) C11.2 ; X4.1 48.45,67.7 v1(49,68.25)
  other v1: 35.375,36.35 37.125,38.65 25.95,54.635 60.5,61 53.75,62
LED1: R1.2 U3.4 | length 21.3
  Top Layer w0.2: R1.2 16.5,57.5 17.75,56.25 19.75,56.25 25.25,50.75 26.5,50.75 29.15,48.1 U3.4
LED2: R2.2 U3.3 | length 18.8
  Top Layer w0.2: R2.2 18.5,57.953 25.273,51.18 26.57,51.18 29.25,48.5 U3.3
LED3: R3.2 U3.2 | length 17.5
  Top Layer w0.2: R3.2 20.5,56.5 25.5,51.5 26.75,51.5 29.35,48.9 U3.2
NetB1_4: B1.4 R12.1 | length 1.8
  Bottom Layer w0.2: R12.1 13.825,52.75 13.925,52.85 B1.4
NetC2_2: C2.2 D5.2 V1.5 V1.6 V1.7 | length 6.1
  Top Layer w0.2: V1.5 56.45,60.095 56.675,59.87 C2.2
  Top Layer w0.4: V1.5 V1.6 ; V1.7 V1.6 ; v1(58.25,61.365) V1.6
NetC4_2: C4.2 R6.1 Y1.3 | length 3.6
  Top Layer w0.2: Y1.3 37.301,36.175 C4.2 R6.1
NetC9_2: C9.2 U2.7 | length 4.6
  Top Layer w0.2: U2.7 20.525,52.775 v1(21,53.25)
  Bottom Layer w0.2: v1(21,53.25) C9.2
NetD1_1: D1.1 R1.1 | length 1.5
  Top Layer w0.2: R1.1 16.503,59.928 D1.1
NetD2_1: D2.1 R2.1 | length 1.5
  Top Layer w0.2: R2.1 18.503,59.928 D2.1
NetD3_1: D3.1 R3.1 | length 1.5
  Top Layer w0.2: R3.1 20.503,59.928 D3.1
NetD4_1: D4.1 R7.2 | length 1.7
  Top Layer w0.2: R7.2 D4.1
NetD7_1: D7.1 R16.1 R17.2 | length 3.9
  Bottom Layer w0.2: D7.1 14.819,45.181 15.319,45.181 16.242,44.258 16.567,44.258 R16.1 R17.2
NetR8_1: R8.1 U1.8 | length 4.6
  Top Layer w0.2: U1.8 40.975,61.725 41.25,62 41.25,63.889 41,64.139 v1(41,64.25)
  Bottom Layer w0.2: v1(41,64.25) R8.1
NetR10_2: R10.2 S2.1 | length 6.8
  Top Layer w0.2: S2.1@28.516,61.45 v1(28.516,65.95)
  Bottom Layer w0.2: v1(28.516,65.95) 29.05,65.95 29.598,65.402 29.598,64.377 R10.2
ORing_EN: U3.33 X4.11 | length 29.8
  Top Layer w0.2: U3.33 44.25,44.5 50,50.25 v1(50,53)
  Bottom Layer w0.2: X4.11 48.55,65.7 49.5,64.75 49.5,57.25 50,56.75 v1(50,53)
QSPI_SCLK: M1.6 U3.56 | length 7.3
  Top Layer w0.2: M1.6@33.165,55.79 34.25,55.79 35.05,54.99 U3.56
QSPI_SD0: M1.5 U3.57 | length 6
  Top Layer w0.2: M1.5@33.05,54.635 34.155,54.635 34.65,54.14 U3.57
QSPI_SD1: M1.2 U3.59 | length 17.4
  Top Layer w0.2: M1.2@25.95,57.175 24.635,57.175 24,56.54 24,54.25 25.5,52.75 33.25,52.75 33.85,52.15 U3.59
QSPI_SD2: M1.3 U3.58 | length 16
  Top Layer w0.2: M1.3@25.95,55.905 24.905,55.905 24.5,55.5 24.5,54.25 25.5,53.25 33.75,53.25 34.25,52.75 U3.58
QSPI_SD3: M1.7 U3.55 | length 9.1
  Top Layer w0.2: M1.7@33.05,57.175 34.615,57.175 35.45,56.34 U3.55
QSPI_SS: M1.1 R9.1 U3.60 | length 23.4
  Top Layer w0.2: v1(25.95,58.445) 24.8,58.445 23.5,57.145 23.5,54.25 25.5,52.25 32.5,52.25 33.45,51.3 U3.60
  Bottom Layer w0.2: R9.1 25,59.395 v1(25.95,58.445)
REGOUT: C10.2 U2.8 U3.42 | length 31.7
  Top Layer w0.2: v1(19.25,53.25) 19.875,52.625 U2.8 ; v1(38.5,48.25) 38.635,48.25 38.785,48.1 U3.42
  Bottom Layer w0.2: C10.2 v1(19.25,53.25) 19.25,52.25 21,50.5 23.75,50.5 28.5,55.25 30.6,55.25 35.85,50 36.75,50 v1(38.5,48.25)
RP2350_D_N: R5.1 X1.2 | length 27.6
  Top Layer w0.23: R5.1 cw(c37.75,56.496) 37.179,56.496 37.179,56.75 cw(c37.929,56.75) 37.929,57.5 48.75,57.5 cw(c48.75,55) 51.25,55 51.25,53.143 ccw(c52.25,53.143) 52.25,52.143 53.107,52.143 cw(c53.107,51.25) 54,51.25 54,48.72 cw(c52.55,48.72) X1.2
RP2350_D_P: R4.1 X1.3 | length 28.7
  Top Layer w0.23: R4.1 ccw(c36.25,56.496) 36.821,56.496 36.821,56.75 cw(c37.929,56.75) 37.929,57.857 48.75,57.857 cw(c48.75,55) 51.607,55 51.607,53.143 ccw(c52.25,53.143) 52.25,52.5 53.107,52.5 cw(c53.107,51.25) 54.357,51.25 54.357,48.663 ccw(c55.75,48.663) X1.3
RP2350_DX_N: R5.2 U3.51 | length 5.1
  Top Layer w0.23: U3.51@37.028,49.961 37.028,53.893 cw(c37.75,53.893) R5.2@37.75,54.615
RP2350_DX_P: R4.2 U3.52 | length 4.9
  Top Layer w0.23: R4.2@36.25,54.615 cw(c36.25,54.193) 36.671,54.193 U3.52@36.671,49.961
RUN: S2.2 U3.26 | length 28.4
  Top Layer w0.2: v1(30.666,54.084) 30.666,61.45 S2.2@30.666,65.95 ; U3.26 37.46,43.05 37.46,41.79 v1(37.5,41.75)
  Bottom Layer w0.2: v1(30.666,54.084) 37.5,47.25 v1(37.5,41.75)
SCL0: R14.1 U1.3 U2.5 U3.8 | length 35.6
  Top Layer w0.2: v1(21.5,51.5) 21.5,51.365 21.825,51.04 U2.5 21.75,49.863 21.75,48.75 22.75,47.75 26.75,47.75 v1(27.5,47) 28,46.5 U3.8 ; v1(34.75,60.75) 34.885,60.75 35.21,60.425 U1.3
  Bottom Layer w0.2: v1(21.5,51.5) 21.5,52.528 25.722,56.75 30.75,56.75 v1(34.75,60.75) ; v1(27.5,47) R14.1
SCL_5V: U1.6 X4.18 | length 7.8
  Top Layer w0.2: U1.6 41.425,60.425 41.75,60.75 41.75,63.5 v1(43,64.75)
  Bottom Layer w0.2: v1(43,64.75) 43.135,64.75 43.385,64.5 X4.18
SDA0: R13.1 U1.4 U2.4 U3.7 | length 32.9
  Top Layer w0.2: v1(22.461,52.031) 22.468,52.024 22.468,49.945 U2.4 22.475,48.775 23,48.25 28,48.25 v1(29,47.25) 29.135,47.25 29.485,46.9 U3.7 ; v1(34.75,59.75) 34.762,59.762 36.287,59.762 U1.4
  Bottom Layer w0.2: v1(22.461,52.031) 22.461,52.711 25.75,56 31,56 v1(34.75,59.75) ; v1(29,47.25) R13.1
SDA_5V: U1.5 X4.20 | length 7.7
  Top Layer w0.2: U1.5 41.775,59.775 42.25,60.25 42.25,63 v1(43,63.75)
  Bottom Layer w0.2: v1(43,63.75) 43.135,63.75 43.485,64.1 X4.20
Seg_LE: H1.5 U3.28 | length 34.4
  Top Layer w0.2: U3.28 38.25,42.32 39.32,41.25 41.25,41.25 44.5,38 44.5,20.75 45.5,19.75 50.04,19.75 H1.5
SPI0_MISO: H1.8 U3.32 | length 27.9
  Top Layer w0.2: U3.32 42.65,44.1 54.29,32.46 H1.8
SPI0_MOSI: H1.6 U3.31 | length 25.6
  Top Layer w0.2: U3.31 41.3,43.7 51.75,33.25 H1.6
SPI0_SCK: H1.1 U3.34 | length 29.1
  Top Layer w0.2: U3.34 43.015,44.9 43.365,45.25 v1(43.5,45.25)
  Bottom Layer w0.2: v1(43.5,45.25) 45,43.75 45,23.13 H1.1
SPI1_MISO: M2.4 U3.12 | length 25.8
  Top Layer w0.2: M2.4 12.905,35.905 16.75,39.75 26.25,39.75 31.4,44.9 U3.12
SPI1_MOSI: M2.3 U3.15 | length 27.6
  Top Layer w0.2: M2.3 14.385,34.635 18.25,38.5 29.68,38.5 31.25,40.07 31.25,43 31.95,43.7 U3.15
SPI1_SCK: M2.2 U3.14 | length 28.1
  Top Layer w0.2: v1(14.75,36.25) 17.5,39 28.93,39 30.5,40.57 30.5,43.25 31.35,44.1 U3.14
  Bottom Layer w0.2: v1(10.711,33.365) 11.865,33.365 v1(14.75,36.25)
TS1: C16.2 R12.2 U2.6 X2.2 | length 17.5
  Top Layer w0.2: v1(21.175,48.5) U2.6
  Bottom Layer w0.2: X2.2 10.25,48.25 14.5,48.25 15.175,48.925 C16.2 R12.2 17.307,51.25 20.057,48.5 v1(21.175,48.5)
U\S\B\_\B\O\O\T\: R9.2 S1.1 | length 7.1
  Top Layer w0.2: S1.1@23.925,61.45 v1(23.925,65.99)
  Bottom Layer w0.2: v1(23.925,65.99) 24.81,65.99 25,65.8 R9.2
VC0: C24.1 R18.2 U2.17 | length 14.5
  Top Layer w0.2: U2.17 22.475,45.475 v1(23,46)
  Bottom Layer w0.2: v1(23,46) 25.25,43.75 29.25,43.75 30.675,42.325 C24.1 30.45,41.025 30.45,40.545 29.83,39.925 29.83,39.9 29.605,39.675 R18.2
VC1: C25.2 C26.1 R19.2 U2.16 | length 12.1
  Top Layer w0.2: U2.16 21.825,45.69 22,45.865 v1(22,46)
  Bottom Layer w0.2: v1(22,46) 25.25,42.75 25.75,42.75 26.575,41.925 C25.2 ; C26.1 C25.2 ; R19.2 27.015,39.675 26.79,39.9 26.79,39.925 26.575,40.14 C25.2
VC2: C26.2 C27.1 R20.2 U2.15 | length 10.6
  Top Layer w0.2: v1(21,46) 21,45.865 21.175,45.69 U2.15
  Bottom Layer w0.2: v1(21,46) 22.425,44.575 C27.1 C26.2 23.825,40.325 24.475,39.675 R20.2
VC3/4: C27.2 C28.1 R21.2 U2.13 U2.14 | length 8.7
  Top Layer w0.2: U2.13 19.875,43.125 v1(20.5,42.5) 20.513,42.513 20.513,44.05 U2.14
  Bottom Layer w0.2: v1(20.5,42.5) 19.973,42.5 19.675,42.202 C28.1 C27.2 21.075,40.535 21.935,39.675 R21.2
VC5: C28.2 D7.2 R17.1 R22.2 U2.12 | length 10.4
  Top Layer w0.2: v1(17.75,42.5) 19,42.5 19.225,42.725 U2.12
  Bottom Layer w0.2: D7.2 14.75,41.625 15.05,41.325 R17.1 16.825,41.25 C28.2 ; v1(17.75,42.5) 17.865,42.5 18.325,42.04 C28.2 ; R22.2 19.395,39.675 18.55,40.52 18.55,41.025 C28.2
VREG_AVDD: R11.2 U3.46 | length 8.2
  Top Layer w0.2: U3.46@39.06,49.95 39.06,50.397 39.452,50.79 43.5,50.79 v1(45,52.29)
  Bottom Layer w0.2: v1(45,52.29) R11.2@45,53.325
VREG_LX: L2.2 U3.48 | length 5.9
  Top Layer w0.2: U3.48 38.25,50.79 39.2,51.74 40.2,51.74 40.79,52.33 v1(41.5,52.33)
  Bottom Layer w0.2: v1(41.5,52.33) L2.2@41.5,53.54
XIN: C3.2 U3.21 Y1.1 | length 5.4
  Top Layer w0.2: C3.2 35.351,38.675 Y1.1 ; Y1.1@35.44,39.2 U3.21@35.44,42.745
XOUT: R6.2 U3.22 | length 6.3
  Top Layer w0.2: U3.22 35.85,40.44 36.54,39.75 38.4,39.75 R6.2@38.975,39.175
pads on no net: H1.3 H1.4 M2.7 U2.1 U2.2 U2.11 U3.5 U3.13 U3.16 U3.19 U3.24 U3.25 U3.37 U3.40 U3.41 U3.43 V1.8 X1.1 X4.3 X4.4 X4.6 X4.8 X4.9 X4.10 X4.12 X4.13 X4.14 X4.15 X4.16

## Polygon pours and split planes (outlines as drawn)
+3V3 on Power Layer "+3V3 Power Poly" (solid, remove dead copper, pour order 2): 0,0 0,72.5 72.5,72.5 72.5,0
+1V1 on Power Layer "+1V1 Power Poly" (solid, remove dead copper, pour order 0): 32,50.75 40.5,50.75 40.5,42.25 39.25,42.25 39.25,49.5 33.25,49.5 33.25,42.25 32,42.25
GND on Ground Layer "GND Poly" (solid, remove dead copper, pour order 1): 0,0 0,72.5 72.5,72.5 72.5,0
GND on Top Layer "Top GND Poly" (hatched 45Degree grid 0.6 track 0.2, remove dead copper, pour order 3): 0,0 0,72.5 72.5,72.5 72.5,0
GND on Bottom Layer "Bottom GND Poly" (hatched 45Degree grid 0.6 track 0.2, remove dead copper, pour order 4): 0,0 0,72.5 72.5,72.5 72.5,0

## Keep-outs
Keep-Out Layer:
  the board outline again, w0.2

## Silkscreen, mask and mechanical layers (free items; w line width, h text height)
Top Overlay:
  drawing of 13 lines, arcs and shapes, not listed
  text "BOOT" at 23.534,67.2 h0.8
  text "RUN" at 28.525,67.2 h0.8
  text "NTC / THERM" at 9.9,51.95 h1 r90
  text "CELL MON" at 20.668,37.75 h1
  text "CONTROL BOARD" at 44.152,33.9 h1.2
  text "V1" at 50.95,31.15 h1.2
  text "INDICATION" at 47.168,27.98 h1
Bottom Overlay:
  circle w0.2: c31.25,69.25 r0.5
  circle w0.2: c57.75,33.25 r0.5
  region: 63.799,35.602 64.67,35.602 64.67,34.716 67.329,34.716 67.329,35.602 68.215,35.602 68.215,33.829 67.329,33.829 67.329,32.057 68.215,32.057 68.215,33.829 69.988,33.829 69.988,32.944 69.987,32.944 69.987,32.943 69.102,32.943 69.102,32.057 69.987,32.057 69.987,32.056 69.988,32.056 69.988,31.17 70.875,31.17 70.875,29.398 69.988,29.398 69.988,30.284 69.103,30.284 69.103,30.285 69.102,30.285 69.102,31.17 68.215,31.17 68.215,30.285 68.214,30.285 68.214,30.284 67.329,30.284 67.329,31.17 64.67,31.17 64.67,30.284 63.785,30.284 63.785,30.285 63.784,30.285 63.784,31.17 62.897,31.17 62.897,30.285 62.896,30.285 62.896,30.284 62.011,30.284 62.011,29.398 61.125,29.398 61.125,31.17 62.011,31.17 62.011,32.056 62.012,32.056 62.012,32.057 62.897,32.057 62.897,32.943 62.012,32.943 62.012,32.944 62.011,32.944 62.011,33.829 63.784,33.829 63.784,32.057 64.67,32.057 64.67,33.829 63.784,33.829 63.784,35.602 63.798,35.602
  region: 67.329,30.213 67.329,29.398 66.443,29.398 66.443,30.283 66.444,30.283 66.444,30.284 67.329,30.284 67.329,30.215
  region: 69.988,34.102 69.988,34.715 69.989,34.715 69.989,34.716 70.875,34.716 70.875,33.829 69.988,33.829 69.988,34.101
  region: 61.125,34.467 61.125,34.716 62.01,34.716 62.01,34.715 62.011,34.715 62.011,33.829 61.125,33.829 61.125,34.466
  region: 65.001,29.398 64.67,29.398 64.67,30.284 65.555,30.284 65.555,30.283 65.556,30.283 65.556,29.398 65.002,29.398
  lines w0.2: 30.75,69.75 31.75,68.75 ; 32.25,69.25 33,69.25 ; 32.75,69 33,69.25 ; 32.75,69.5 33,69.25 ; 35.875,41.75 35.625,42 ; 35.875,42.25 35.625,42 ; 36.625,41.75 36.875,42 ; 36.625,42.25 36.875,42 ; 57.25,33.75 58.25,32.75 ; 57.5,30.75 57.75,30.5 ; 57.5,31.5 57.75,31.75 ; 58,30.75 57.75,30.5 ; 58,31.5 57.75,31.75 ; 35.625,42 36.875,42 ; 57.75,30.5 57.75,31.75 ; 57.75,31.75 57.75,31.75 ; 32.75,69.25 32.75,69.25
  text "4.25mm" at 30.05,68.85 h0.8
  text "56.5mm" at 38.449,42.595 h0.8
  text "holes" at 38.049,40.5 h0.8
  text "72.5mm" at 56.55,32.85 h0.8
  text "56mm MAX" at 56.55,30.725 h0.8
  text "LED" at 46.27,25.2 h0.8 r270
  text "MOSI" at 48.81,25.2 h0.8 r270
  text "MISO" at 51.35,25.2 h0.8 r270
  text "GND" at 56.43,25.2 h0.8 r270
  text "LE" at 56.43,18.927 h0.8 r270
  text "SCK" at 46.27,18.127 h0.8 r270
  text "\OE" at 53.89,18.127 h0.8 r270